# Altium PCB MB.PcbDoc (part 7 of 10)
Units mm, origin at the board's own origin, x right, y up, seen from the top; angles counter-clockwise.
Board outline 203 x 72 mm, 6 copper layers (Top Layer, Layer 3, Layer 1, Layer 2, Layer 4, Bottom Layer), stack 1.52 mm thick; 653 components, 568 nets, 2914 pads, 2399 vias.
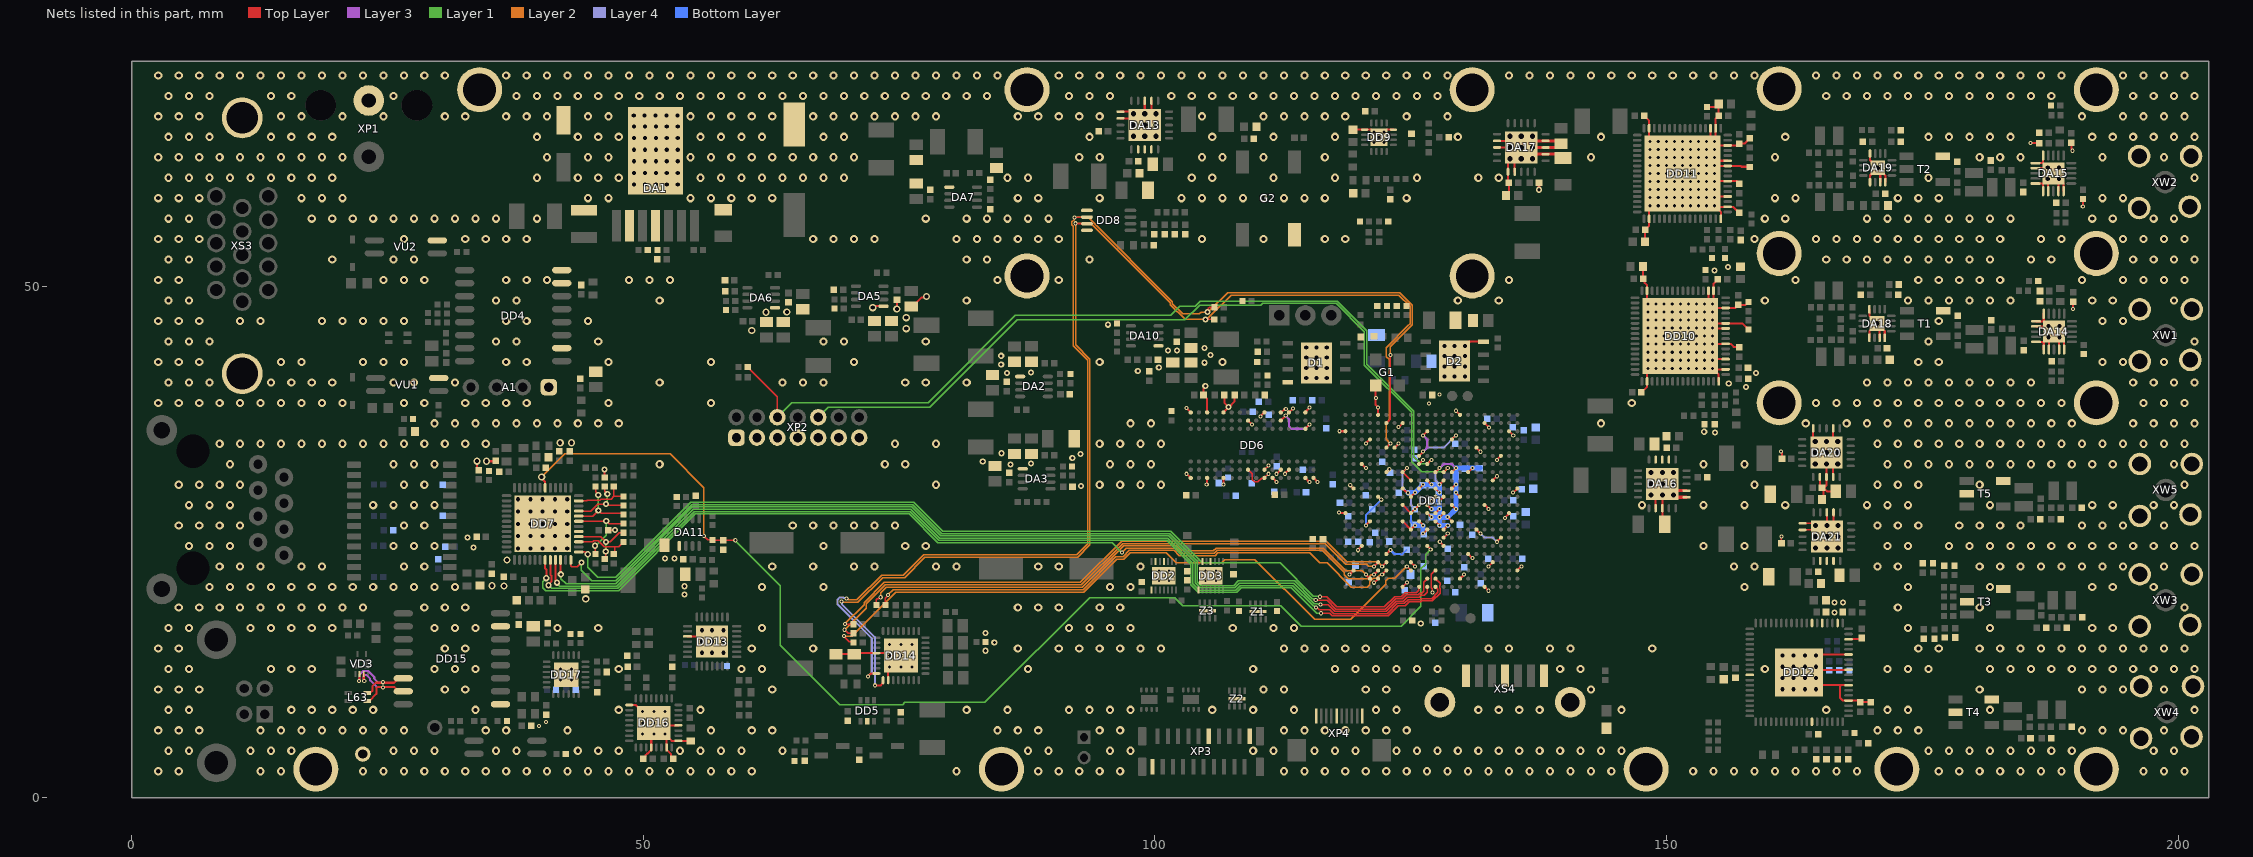
[diagram p10: the nets of this part, all layers, seen from the top]

## Via types
v1: diameter 0.8, hole 0.4, Top Layer to Bottom Layer, tented both sides, 1127 vias
v2: diameter 0.4, hole 0.2, Top Layer to Bottom Layer, tented both sides, 627 vias
v3: diameter 0.6, hole 0.3, Top Layer to Bottom Layer, tented both sides, 348 vias
v4: diameter 0.8, hole 0.4, Top Layer to Bottom Layer, 92 vias
v5: diameter 0.7, hole 0.4, Top Layer to Bottom Layer, tented both sides, 90 vias
v6: diameter 0.9, hole 0.5, Top Layer to Bottom Layer, 45 vias
v7: diameter 0.66, hole 0.4, Top Layer to Bottom Layer, 25 vias
v8: diameter 0.7, hole 0.3, Top Layer to Bottom Layer, 22 vias
v9: diameter 0.5, hole 0.2, Top Layer to Bottom Layer, 12 vias
v10: diameter 0.5, hole 0.3, Top Layer to Bottom Layer, 5 vias
v11: diameter 1, hole 0.5, Top Layer to Bottom Layer, 2 vias
v12: diameter 0.4, hole 0.2, Top Layer to Bottom Layer, 2 vias
v13: diameter 0.9, hole 0.4, Top Layer to Bottom Layer, tented both sides, 2 vias

## Nets (pads, with @x,y where several pads share a name; then routed paths per layer and width w, separated by ;. In a path a pad name is that pad's centre, name@x,y a point inside that pad or via, vN(x,y) a via of type N, cw(c..) or ccw(c..) an arc to the next point about the centre after c; other vN are vias at no path point) (continued)
ETH_RST: C155.2 DD1.U11 DD7.42 R70.1 | length 117.2
  Top Layer w0.125: v2(55.925,25.575) 56.285,25.215 R70.1@56.769,25.215 56.824,25.16 C155.2@57.825,25.16 58.973,25.16 v2(58.988,25.175)
  Top Layer w0.2: v5(40.069,31.369) 40.069,31.234 40.394,30.909 40.394,30.321 DD7.42@40.413,30.302 ; DD1.U11@126.612,24.625 126.612,24.619 126.95,24.281 v2(126.95,24.275)
  Layer 1 w0.125: v2(58.988,25.175) 58.988,25.137 63.375,20.75 63.375,14.925 69.195,9.105 75.337,9.105 75.557,9.325 83.389,9.325 93.639,19.575 101.925,19.575 102.725,18.775 112.315,18.775 114.313,16.777 124.077,16.777 126,18.7 126,22.379 126.449,22.828 126.449,23.774 v2(126.95,24.275)
  Layer 2 w0.125: v5(40.069,31.369) 42.312,33.613 52.637,33.613 55.925,30.325 v2(55.925,25.575)
ETH_RXC: DD7.35 R60.1 R75.1 | length 5.5
  Top Layer w0.125: DD7.35@43.688,29.027 44.467,29.027 44.502,29.063 45.754,29.063 45.881,29.19 46.843,29.19 47.117,29.464 ; R75.1@47.117,30.411 47.117,29.464 ; R60.1@48.064,29.464 47.117,29.464
ETH_RXCTL: DD7.33 R65.1 R76.1 | length 6.6
  Top Layer w0.125: DD7.33@43.688,28.027 44.864,28.027 45.539,28.702 46.484,28.702 46.611,28.575 R65.1@48.064,28.575 ; R76.1@46.228,30.411 46.228,29.97 46.482,29.716 v3(46.482,29.677)
  Layer 1 w0.125: v3(46.355,28.702) 46.355,28.831 46.482,28.958 v3(46.482,29.677)
ETH_RXD0: DD7.32 R66.2 R71.1 | length 7.2
  Top Layer w0.125: DD7.32@43.688,27.527 45.039,27.527 45.588,28.076 v3(45.602,28.076) ; R71.1@45.339,30.411 45.339,29.902 45.593,29.648 v3(45.593,29.591) ; v3@45.579,28.067 45.65,28.067 45.904,27.813 47.937,27.813 R66.2@48.064,27.686
  Layer 1 w0.125: v3(45.593,29.591) 45.597,29.587 45.597,28.08 v3(45.602,28.076)
ETH_RXD1: DD7.31 R67.2 R72.1 | length 8.2
  Top Layer w0.125: DD7.31@43.688,27.027 46.352,27.027 v3(46.375,27.05) 46.433,27.05 46.686,26.797 R67.2@48.064,26.797 ; v3(45.289,24.634) 45.289,23.868 R72.1@45.339,23.818
  Layer 1 w0.125: v3(45.289,24.634) 45.335,24.634 46.375,25.674 v3(46.375,27.05)
ETH_RXD2: DD7.28 R68.1 R73.1 | length 6.5
  Top Layer w0.125: DD7.28@43.688,25.527 45.856,25.527 v3(46.369,25.014) 46.389,25.034 46.784,25.034 47.65,25.9 48.056,25.9 R68.1@48.064,25.908 ; R73.1@46.228,23.564 46.304,23.564 46.328,23.587 v3(46.328,24.089)
  Layer 1 w0.125: v3(46.328,24.089) 46.348,24.11 46.348,24.993 v3(46.369,25.014)
ETH_RXD3: DD7.27 R69.1 R74.1 | length 5.6
  Top Layer w0.125: DD7.27@43.688,25.027 45.039,25.027 45.137,25.126 45.604,25.126 46.178,24.552 47.227,24.552 ; R74.1@47.117,23.818 47.227,23.928 47.227,24.552 ; R69.1@48.064,25.019 47.597,24.552 47.227,24.552
ETH_TXC: DD1.AA11 DD7.24 | length 96.2
  Top Layer w0.125: DD7.24@42.913,23.252 42.913,22.679 42.986,22.606 43.561,22.606 v3(43.942,22.987) ; v2(115.712,19.342) 115.765,19.289 116.829,19.289 117.668,18.45 122.51,18.45 123.51,19.45 124.186,19.45 124.561,19.825 125.714,19.825 125.901,20.012 126.062,20.012 126.249,20.199 126.249,21.062 DD1.AA11@126.612,21.425
  Layer 1 w0.125: v3(43.942,22.987) 43.942,22.258 44.975,21.225 47.284,21.225 54.709,28.65 76.343,28.65 79.168,25.825 101.443,25.825 104.15,23.118 104.15,21.125 104.525,20.75 107.7,20.75 108.15,21.2 113.66,21.2 115.38,19.479 115.5,19.479 115.638,19.342 v2(115.712,19.342)
ETH_TXCTL: DD1.AB10 DD7.25 | length 92.1
  Top Layer w0.125: DD7.25@43.688,24.027 44.279,24.027 44.503,23.804 v3(44.572,23.804) ; v2(116.135,19.652) 116.146,19.64 116.796,19.64 117.761,18.675 122.417,18.675 123.417,19.675 124.093,19.675 124.468,20.05 125.525,20.05 125.759,20.284 125.759,20.572 DD1.AB10@125.812,20.625
  Layer 1 w0.125: v3(44.572,23.804) 44.572,22.553 45.55,21.575 47.316,21.575 54.616,28.875 76.436,28.875 79.261,26.05 101.536,26.05 104.636,22.95 112.236,22.95 115.482,19.704 115.862,19.704 115.876,19.691 116.095,19.691 v2(116.135,19.652)
ETH_TXD0: DD1.Y5 DD7.19 | length 91.5
  Top Layer w0.2: DD7.19@40.413,23.252 40.413,22.432 40.53,22.315 40.53,21.48 v3(40.513,21.463) ; v2(121.411,21.824) DD1.Y5@121.812,22.225
  Layer 1 w0.125: v3(40.513,21.463) 40.15,21.1 40.15,20.55 40.45,20.25 47.582,20.25 55.082,27.75 75.97,27.75 78.795,24.925 95.812,24.925 v2(96.777,23.96)
  Layer 2 w0.125: v2(96.777,23.96) 97.217,24.4 101.981,24.4 102.481,23.9 105.793,23.9 106.068,24.175 116.363,24.175 118.5,22.038 118.5,21.821 118.896,21.425 120.802,21.425 121.157,21.779 121.366,21.779 v2(121.411,21.824)
ETH_TXD1: DD1.AA12 DD7.20 | length 101.3
  Top Layer w0.125: v2(116.223,18.04) 117.06,18.04 117.325,17.775 122.789,17.775 123.789,18.775 124.466,18.775 124.841,19.15 125.993,19.15 126.093,19.25 127.121,19.25 127.861,19.991 127.861,20.482 127.85,20.494 127.85,20.775 127.861,20.787 127.861,20.976 DD1.AA12@127.412,21.425
  Top Layer w0.2: v3(40.746,20.773) 40.746,20.881 41.038,21.173 41.038,21.68 40.913,21.805 DD7.20@40.913,23.252
  Layer 1 w0.125: v3(40.746,20.773) 41.044,20.475 47.489,20.475 54.989,27.975 76.063,27.975 78.888,25.15 101.163,25.15 103.475,22.838 103.475,20.845 104.245,20.075 107.98,20.075 108.43,20.525 113.329,20.525 115.814,18.04 v2(116.223,18.04)
ETH_TXD2: DD1.AB12 DD7.21 | length 98.9
  Top Layer w0.125: v2(115.75,18.617) 115.824,18.617 116.039,18.402 117.079,18.402 117.482,18 122.696,18 123.696,19 124.372,19 124.747,19.375 125.9,19.375 126,19.475 127.028,19.475 127.636,20.084 127.636,20.401 DD1.AB12@127.412,20.625
  Top Layer w0.2: DD7.21@41.413,23.252 41.413,21.243 41.552,21.103 v3(41.552,21.026)
  Layer 1 w0.125: v3(41.552,21.026) 41.552,20.995 41.847,20.7 47.396,20.7 54.896,28.2 76.157,28.2 78.982,25.375 101.257,25.375 103.7,22.932 103.7,20.939 104.339,20.3 107.886,20.3 108.336,20.75 113.473,20.75 115.469,18.754 115.539,18.754 115.677,18.617 v2(115.75,18.617)
ETH_TXD3: DD1.AB11 DD7.22 | length 96.9
  Top Layer w0.125: v2(116.183,18.875) 116.925,18.875 117.575,18.225 122.603,18.225 123.603,19.225 124.279,19.225 124.654,19.6 125.807,19.6 125.994,19.787 126.314,19.787 126.612,20.085 DD1.AB11@126.612,20.625
  Top Layer w0.2: DD7.22@41.913,23.252 41.913,21.869 v3(41.938,21.844)
  Layer 1 w0.125: v3(41.938,21.844) 41.945,21.837 41.945,21.43 42.45,20.925 47.302,20.925 54.802,28.425 76.25,28.425 79.075,25.6 101.35,25.6 103.925,23.025 103.925,21.032 104.432,20.525 107.793,20.525 108.243,20.975 113.567,20.975 115.562,18.979 115.908,18.979 115.96,18.928 116.13,18.928 v2(116.183,18.875)
GND: A1.1 C1.1 C2.1 C3.2 C4.1 C5.1 C6.1 C7.1 C8.1 C9.1 C10.1 C11.1 C12.1 C14.2 C15.1 C16.1 C17.1 C18.1 C19.1 C21.1 C22.1 C23.1 C26.2 C30.1 C31.1 C32.1 C33.1 C34.1 C35.1 C36.1 C37.1 C38.1 C39.1 C40.1 C41.1 C42.1 C43.1 C45.1 C46.1 C47.1 C48.1 C49.1 C50.1 C51.1 C53.1 C55.1 C56.1 C57.1 C59.1 C60.1 C61.1 C62.1 C63.1 C64.1 C65.1 C66.1 C67.1 C68.1 C69.1 C71.1 C75.1 C76.1 C77.1 C78.1 C79.1 C80.1 C81.1 C84.1 C85.1 C86.1 C87.1 C88.1 C89.1 C91.1 C92.1 C93.1 C94.1 C95.1 C96.1 C97.1 C98.1 C99.1 C100.1 C101.1 C102.1 C103.1 C104.1 C105.1 C106.1 C107.1 C108.1 C109.1 C110.1 C111.1 C112.1 C113.1 C114.1 C115.1 C116.1 C117.1 C118.1 C119.1 C120.1 C121.1 C122.2 C123.1 C124.1 C125.1 C126.1 C127.2 C128.1 C129.1 C131.1 C132.1 C133.1 C134.1 C135.1 C136.1 C138.1 C139.1 C140.1 C142.1 C143.1 C144.1 C145.1 C146.1 C147.1 C148.1 C149.1 C150.1 C151.1 C152.1 C153.1 C154.1 C155.1 C156.1 C157.1 C158.1 C159.1 C160.1 C161.1 C162.1 C163.1 C164.1 C165.1 C166.1 C167.1 C168.1 C169.1 C170.1 C171.1 C172.1 C173.2 C174.1 C175.1 C176.1 C177.1 C178.1 C179.1 C180.1 C181.2 C182.1 C183.2 C184.1 C185.1 C186.1 C187.1 C188.1 C189.1 C190.2 C191.1 C192.1 C193.2 C194.1 C195.2 C196.1 C197.1 C198.1 C199.1 C200.1 C202.1 C203.1 C204.1 C205.1 C208.1 C209.2 C210.1 C211.1 C212.1 C215.1 C216.1 C217.1 C218.1 C219.1 C220.1 C221.1 C222.1 C223.1 C224.1 C225.1 C226.1 C227.1 C228.1 C229.1 C230.1 C231.1 C232.1 C233.1 C234.1 C235.1 C236.1 C237.1 C242.1 C245.1 C247.1 C251.1 C252.1 C254.1 C255.1 C256.1 C257.1 C258.1 C259.1 C260.1 C261.1 C262.1 C263.1 C264.1 C265.1 C266.1 C267.1 C269.1 C270.1 C271.1 C272.1 C273.1 C274.1 C275.1 C276.1 C277.1 C278.1 C279.1 C280.1 C281.1 C282.1 C283.1 C284.1 C285.1 C286.1 C287.1 C288.1 C289.1 C290.1 C291.1 C292.1 C293.1 C294.1 C295.1 C296.1 C297.2 C298.1 C299.2 C301.1 C303.1 C306.1 C308.1 C309.1 C314.1 C316.1 C317.1 C320.1 C321.1 C322.1 C327.1 C346.1 C347.2 C348.2 C352.2 C359.1 D1.4 D1.9 D2.4 D2.9 DA1.2 DA1.4 DA1.8 DA2.1 DA3.1 DA5.1 DA6.1 DA7.1 DA10.1 DA11.1 DA13.7 DA13.8 DA13.11 DA13.12 DA13.17 DA13.18 DA13.19 DA13.21 DA14.10 DA14.11 DA14.12 DA14.15 DA14.16 DA14.17 DA14.19 DA14.20 DA14.21 DA15.10 DA15.11 DA15.12 DA15.15 DA15.16 DA15.17 DA15.19 DA15.20 DA15.21 DA16.7 DA16.8 DA16.11 DA16.12 DA16.17 DA16.18 DA16.19 DA16.21 DA17.7 DA17.8 DA17.11 DA17.12 DA17.17 DA17.18 DA17.19 DA17.21 DA18.4 DA18.9 DA18.11 DA18.12 DA18.17 DA19.4 DA19.9 DA19.11 DA19.12 DA19.17 DA20.7 DA20.10 DA20.17 DA20.18 DA20.19 DA20.21 DA21.7 DA21.8 DA21.11 DA21.12 DA21.17 DA21.18 DA21.19 DA21.21 DD1.A5 DD1.A15 DD1.AA5 DD1.AA15 DD1.AB8 DD1.AB18 DD1.B8 DD1.B18 DD1.C1 DD1.C11 DD1.C21 DD1.D4 DD1.D14 DD1.E7 DD1.E17 DD1.F10 DD1.F20 DD1.G3 DD1.G10 DD1.H6 DD1.H8 DD1.H12 DD1.H14 DD1.H16 DD1.J9 DD1.J11 DD1.J13 DD1.J19 DD1.K2 DD1.K8 DD1.K10 DD1.K12 DD1.K14 DD1.K22 DD1.L5 DD1.L9 DD1.L12 DD1.L13 DD1.L15 DD1.M8 DD1.M10 DD1.M11 DD1.M14 DD1.M18 DD1.N1 DD1.N9 DD1.N11 DD1.N12 DD1.N13 DD1.N21 DD1.P4 DD1.P8 DD1.P10 DD1.P12 DD1.P14 DD1.R9 DD1.R11 DD1.R13 DD1.R17 DD1.T13 DD1.T20 DD1.U3 DD1.U13 DD1.V6 DD1.V16 DD1.W9 DD1.W19 DD1.Y2 DD1.Y12 DD1.Y22 DD2.4 DD2.6 DD2.8 DD2.15 DD3.4 DD3.6 DD3.8 DD3.15 DD4.2 DD4.7 DD4.8 DD5.2 DD6.A9 DD6.B1 DD6.B3 DD6.B9 DD6.D1 DD6.D8 DD6.E1 DD6.E2 DD6.E8 DD6.F9 DD6.G1 DD6.G8 DD6.G9 DD6.J2 DD6.J8 DD6.M1 DD6.M9 DD6.P1 DD6.P9 DD6.T1 DD6.T9 DD7.29 DD7.49 DD8.5 DD8.8 DD9.5 DD9.16 DD9.17 DD10.2 DD10.4 DD10.7 DD10.10 DD10.11 DD10.14 DD10.18 DD10.19 DD10.31 DD10.50 DD10.64 DD10.65 DD11.2 DD11.4 DD11.7 DD11.10 DD11.11 DD11.14 DD11.18 DD11.19 DD11.31 DD11.50 DD11.64 DD11.65 DD12.2 DD12.5 DD12.7 DD12.28 DD12.48 DD12.58 DD12.61 DD12.64 DD12.67 DD12.70 DD12.73 DD13.3 DD13.29 DD14.12 DD14.18 DD14.33 DD15.9 DD15.15 DD16.4 DD16.7 DD16.9 DD16.12 DD16.25 DD16.33 DD17.25 G1.2 G2.2 HL1.2 L56.1 pad.1 R3.2 R5.2 R8.2 R10.2 R11.1 R14.2 R16.2 R18.2 R19.1 R29.1 R30.1 R34.1 R36.1 R45.2 R48.2 R51.2 R53.2 R55.2 R57.2 R58.2 R64.2 R76.2 R80.2 R87.2 R94.2 R95.2 R96.1 R97.1 R102.2 R104.2 R106.2 R108.2 R113.2 R114.2 R120.2 R122.2 R126.2 R128.2 R129.2 R130.2 R144.2 R146.2 R147.2 R148.2 R149.2 R150.2 R151.1 R155.1 R156.1 R158.1 R159.1 R161.1 R164.1 R166.1 R167.1 R168.1 R174.1 R177.1 T1.4 T2.4 T3.2 T3.4 T4.2 T4.4 T5.2 T5.4 VU1.2 VU2.2 XP1.2 XP2.1 XP2.3 XP2.5 XP2.7 XP2.9 XP2.11 XP2.13 XP3.1 XP3.12 XP3.20 XP4.1 XP4.5 XP4.10 XS3.16 XS4.1 XS4.4 XS4.7 XW1.2 XW2.2 XW3.2 XW4.2 XW5.2 Z1.9 Z2.9 Z3.9 | length 312.9
  Top Layer w0.125: C177.1@46.561,26.162 v3(47.244,26.162) ; DD6.J8@109.099,32.068 109.497,31.67 109.497,31.108 109.734,30.87 110.064,30.87 110.423,31.23 110.661,31.23 DD6.G9@110.699,31.268 ; v2(127.11,20.07) 127.087,20.093 127.087,20.458 127.024,20.52 127.024,21.837 DD1.Y12@127.412,22.225 ; C292.1@161.229,24.892 161.229,25.529 v2(161.25,25.55) ; DA21.12@163.289,26.177 165.014,26.177 v6(165.664,25.527) ; DA21.11@163.289,26.827 164.364,26.827 v6(164.564,26.627)
  Top Layer w0.2: v5(33.75,32.9) 33.759,32.891 33.759,32.185 C166.1@33.909,32.035 ; v5(34.671,32.893) 35.512,32.893 C176.1@35.56,32.941 ; v3(46.2,32.075) 46.2,31.339 R76.2@46.228,31.311 ; DD16.25@48.625,9.075 49.275,9.075 v8(49.925,8.425) ; C251.1@50.015,3.825 50.235,4.045 50.235,4.185 50.375,4.325 50.41,4.325 50.725,4.64 50.752,4.64 50.775,4.664 DD16.4@50.775,4.925 50.775,5.975 v8(51.025,6.225) ; v8(52.125,7.325) 52.375,7.075 DD16.12@53.425,7.075 ; C261.1@52.935,3.825 52.715,4.045 52.715,4.25 52.325,4.64 52.298,4.64 52.275,4.664 DD16.7@52.275,4.925 52.275,6.075 52.775,5.575 DD16.9@53.425,5.575 54.595,5.575 L56.1@54.625,5.545 ; DD13.3@54.325,15.775 55.15,15.775 ; C348.2@68.838,14.035 C347.2@70.616,14.035 70.731,14.15 DD14.12@72.775,14.15 73.825,14.15 v8(74.075,13.9) ; v5(72.425,47.9) 72.56,47.9 72.738,48.078 73.447,48.078 DA5.1@73.476,48.049 ; DD14.18@73.925,11.5 73.925,12.65 v8(74.075,12.8) ; v5(74.775,47.775) 74.775,48.673 C15.1@74.793,48.691 ; C8.1@76.19,48.02 76.34,48.02 77.224,48.904 77.579,48.904 v5(77.675,49) ; DA13.12@96.628,66.402 98.353,66.402 v6(99.003,65.752) ; DA13.11@96.628,67.052 97.703,67.052 v6(97.903,66.852) ; v6(99.003,66.852) DA13.8@99.003,68.127 ; DA13.7@99.653,68.127 99.653,67.227 100.028,66.852 v6(100.103,66.852) ; v2@103.082,38.09 DD6.T1@103.501,37.671 ; v2(103.098,31.669) DD6.T9@103.499,31.268 ; v3(104.92,40.259) 104.92,40.151 104.745,39.976 C124.1@104.745,39.37 105.099,39.016 DD6.P1@105.099,37.668 ; v2(105.059,30.607) 105.097,30.645 DD6.P9@105.097,31.27 ; v2(106.698,30.607) 106.698,31.263 DD6.M9@106.701,31.266 ; DD6.M1@106.699,37.668 107.177,38.146 v3(107.177,38.186) ; C125.1@106.777,39.37 106.777,38.591 107.177,38.191 v3(107.177,38.186) ; v3@107.164,38.186 v3(107.177,38.186) ; v3@107.2,38.15 107.793,38.743 C105.1@107.793,39.37 ; DD6.J2@109.099,36.868 v2(109.5,36.467) ; v2(110.298,37.267) DD6.G1@110.699,37.668 ; DD6.G9@110.701,31.266 v2(111.102,31.667) ; DD6.G8@110.701,32.066 v2(111.102,32.467) ; DD6.F9@111.497,31.266 v2(111.899,30.865) ; v2(111.896,31.669) DD6.E8@112.297,32.07 ; DD6.E2@112.301,36.866 112.301,36.874 112.785,37.357 v2(112.785,37.361) ; DD6.E1@112.301,37.666 112.357,37.666 112.617,37.926 112.729,37.926 v2(112.786,37.984) ; v2(112.696,31.669) DD6.D8@113.097,32.07 ; DD6.D1@113.101,37.666 v2(113.502,38.067) ; DD6.B9@114.697,31.266 v2(115.098,30.865) ; DD6.B3@114.701,36.066 v2(115.102,36.467) ; DD6.B1@114.701,37.666 114.701,37.709 115.102,38.11 v2(115.102,38.149) ; DD6.A9@115.497,31.266 v2(115.899,30.865) ; v2(118.001,27.883) 118.03,27.854 118.587,27.854 DD1.N1@118.614,27.827 ; v2(118.023,35.828) 118.025,35.827 DD1.C1@118.61,35.827 ; v2(119.011,21.824) DD1.Y2@119.412,22.225 ; v2(119.086,30.55) 119.408,30.229 DD1.K2@119.412,30.229 ; C200.1@119.359,65.297 119.37,65.308 DD9.5@120.496,65.308 121.146,65.308 v10(121.388,65.066) ; v2(119.835,24.199) 119.835,24.224 120.21,24.598 DD1.U3@120.21,24.627 ; DD1.G3@120.21,32.623 v2(120.611,32.222) ; v2(120.609,26.626) DD1.P4@121.01,27.027 ; v2(120.609,34.626) DD1.D4@121.01,35.027 ; v2(121.411,21.024) DD1.AA5@121.812,21.425 ; G1.2@121.575,40.305 121.575,38.4 121.799,38.176 v2(121.799,38.15) ; DD1.L5@121.81,29.423 121.821,29.423 122.108,29.136 v2(122.115,29.136) ; DD1.A5@121.812,37.425 v2@121.812,38.137 ; v10(122.404,65.066) 122.646,65.308 DD9.16@123.296,65.308 ; DD1.H6@122.612,31.825 v2(122.901,32.114) ; DD1.V6@122.614,23.823 v2(123.015,24.224) ; DD1.E7@123.412,34.225 v2(123.812,34.626) ; v2(123.811,36.224) DD1.B8@124.212,36.625 ; DD1.AB8@124.212,20.625 v2(124.613,21.026) ; DD1.P8@124.212,27.025 DD1.R9@125.012,26.225 v2(125.413,26.626) ; DD1.M8@124.212,28.625 DD1.N9@125.012,27.825 v2(125.413,28.226) DD1.M10@125.812,28.625 ; DD1.K8@124.212,30.225 124.583,29.854 124.687,29.854 v2(124.725,29.816) ; v2(124.613,32.226) DD1.H8@124.212,31.825 DD1.J9@125.012,31.025 ; DD1.W9@125.012,23.025 v2(125.413,22.624) ; DD1.L9@125.012,29.425 v2(125.413,29.826) ; DD1.P10@125.812,27.025 v2(126.213,26.624) ; DD1.K10@125.812,30.225 v2(126.213,30.626) ; DD1.G10@125.812,32.625 v2(126.213,33.026) ; DD1.F10@125.812,33.425 v2(126.213,33.826) ; v2(126.211,25.824) DD1.R11@126.612,26.225 ; v2(126.211,35.424) DD1.C11@126.612,35.825 ; DD1.N11@126.612,27.825 v2(127.013,27.424) ; DD1.M11@126.612,28.625 v2(127.013,28.224) ; DD1.J11@126.612,31.025 v2(127.013,30.624) ; v2(127.011,29.024) DD1.L12@127.412,29.425 ; DD1.P12@127.412,27.025 v2(127.813,26.624) ; DD1.N12@127.412,27.825 v2(127.813,28.226) ; DD1.K12@127.412,30.225 v2(127.813,29.824) ; DD1.H12@127.412,31.825 v2(127.813,32.226) ; v2(127.811,27.424) DD1.N13@128.212,27.825 ; v2(127.811,29.024) DD1.L13@128.212,29.425 ; v2(127.811,30.624) DD1.J13@128.212,31.025 ; v2(127.837,25.026) 127.837,25.013 128.212,24.638 DD1.U13@128.212,24.625 ; DD1.T13@128.212,25.425 v2(128.613,25.826) ; DD1.R13@128.212,26.225 v2(128.613,26.626) ; v2(128.611,27.426) DD1.P14@129.012,27.025 ; DD1.M14@129.012,28.625 v2(129.413,28.224) ; DD1.K14@129.012,30.225 v2(129.413,30.626) ; DD1.H14@129.012,31.825 v2(129.413,32.226) ; DD1.D14@129.012,35.025 v2(129.413,35.426) ; v2(129.411,29.826) DD1.L15@129.812,29.425 ; v2(129.411,37.826) DD1.A15@129.812,37.425 ; DD1.AA15@129.812,21.425 v2(130.213,21.826) ; v4(130.283,44.172) 130.683,44.572 130.795,44.572 130.8,44.577 D2.4@132.098,44.577 ; DD1.V16@130.612,23.825 v2(131.013,23.424) ; DD1.H16@130.612,31.825 v2(131.013,32.226) ; DD1.R17@131.412,26.225 v2(131.813,25.824) ; DD1.E17@131.412,34.225 v2(131.813,33.824) ; DD1.AB18@132.212,20.625 132.212,20.619 132.587,20.244 v2(132.587,20.238) ; DD1.M18@132.212,28.625 v2(132.613,28.224) ; DD1.B18@132.212,36.625 132.22,36.625 132.648,36.197 v2(132.655,36.197) ; v2(132.611,22.624) DD1.W19@133.012,23.025 ; DD1.J19@133.012,31.025 v2(133.413,31.426) ; v2(133.411,25.024) DD1.T20@133.812,25.425 ; v2(133.411,33.024) DD1.F20@133.812,33.425 ; DA17.8@133.426,63.556 v6(134.701,63.556) ; DA17.7@133.426,64.206 135.151,64.206 v6(135.801,63.556) ; v2(134.203,27.337) 134.203,27.376 134.612,27.786 DD1.N21@134.612,27.825 ; C221.1@134.312,58.857 134.579,59.124 C223.1@134.579,60.127 134.501,60.205 DA17.11@134.501,61.181 134.501,62.256 v6(134.701,62.456) ; DD1.C21@134.612,35.825 v2(135.013,35.424) ; DA17.21@134.776,62.456 135.151,62.081 DA17.12@135.151,61.181 ; v2(135.011,29.824) DD1.K22@135.412,30.225 ; DD1.Y22@135.412,22.225 v2(135.813,22.626) ; C267.1@147.544,39.624 148.092,40.172 DD10.50@148.092,40.698 148.092,41.792 148.192,41.892 DD10.65@148.192,41.974 ; C256.1@147.689,51.925 147.71,51.904 C262.1@147.71,50.75 147.85,50.61 147.85,50.325 148.092,50.083 DD10.31@148.092,49.548 148.092,48.454 148.192,48.354 DD10.65@148.192,48.273 ; C269.1@147.798,66.675 148.299,66.174 DD11.31@148.299,65.437 DD11.65@148.299,64.262 ; C259.1@147.9,54.35 C263.1@147.9,55.501 148.299,55.9 DD11.50@148.299,56.587 148.299,57.681 148.399,57.781 DD11.65@148.399,57.862 ; DA16.21@148.558,29.577 148.933,29.202 DA16.7@148.933,28.302 ; v6(149.583,29.577) DA16.8@149.583,28.302 149.583,26.967 C217.1@149.825,26.725 ; DD10.65@152.592,46.373 DD10.11@155.767,46.373 157.411,46.373 R102.2@158.006,45.778 ; DD11.65@152.799,62.262 DD11.11@155.974,62.262 ; DD10.65@153.704,47.485 154.092,47.873 DD10.14@155.767,47.873 156.682,47.873 C264.1@156.99,48.181 157.731,48.181 R104.2@158.006,48.456 ; DD10.65@153.704,48.273 154.092,48.66 DD10.19@154.092,49.548 ; R130.2@153.942,67.506 154.806,67.506 C245.1@155.1,67.8 155.087,67.787 C247.1@155.087,66.675 154.799,66.387 DD11.18@154.799,65.437 154.799,64.343 154.699,64.243 DD11.65@154.699,64.162 ; DD11.19@154.299,65.437 154.299,63.762 DD11.14@155.974,63.762 156.95,63.762 C252.1@157.117,63.929 157.133,63.945 157.62,63.945 R108.2@158.133,64.458 ; DD10.65@154.491,42.761 154.572,42.761 154.685,42.873 DD10.4@155.767,42.873 ; DD10.65@154.491,44.336 154.529,44.373 DD10.7@155.767,44.373 155.778,44.362 156.263,44.362 156.55,44.075 157.063,44.075 C266.1@157.117,44.021 ; DD10.65@154.491,45.91 154.529,45.873 DD10.10@155.767,45.873 ; DD10.65@154.491,48.273 154.491,48.354 154.592,48.454 DD10.18@154.592,49.548 154.592,50.259 C260.1@155.006,50.673 ; DD10.65@154.632,41.833 155.092,41.373 DD10.64@155.092,40.698 ; DD10.65@154.673,41.873 DD10.2@155.767,41.873 ; DD11.65@154.699,58.65 154.78,58.65 154.892,58.762 DD11.4@155.974,58.762 ; DD11.65@154.699,60.262 DD11.7@155.974,60.262 156.878,60.262 C265.1@157.117,60.023 ; DD11.65@154.699,61.762 DD11.10@155.974,61.762 157.238,61.762 157.325,61.675 158.111,61.675 R106.2@158.133,61.653 ; DD11.64@155.299,56.587 155.299,57.262 DD11.65@154.699,57.862 154.78,57.862 154.88,57.762 DD11.2@155.974,57.762 156.488,57.762 156.832,57.418 156.897,57.418 C257.1@157.117,57.198 ; v2(161.2,33.85) 161.2,33.796 161.259,33.737 161.259,33.165 C278.1@161.277,33.147 ; v4(163.51,11.709) 164.21,11.009 167.043,11.009 ; DA20.10@164.326,36.114 164.326,35.039 v6(164.526,34.839) ; DD12.73@164.61,12.509 DD12.64@167.785,12.509 ; v4(164.61,13.909) 164.71,14.009 DD12.67@167.785,14.009 ; DA20.17@164.976,31.364 164.976,30.65 C272.1@165.354,30.272 ; C271.1@165.367,29.129 165.354,29.142 C272.1@165.354,30.272 ; v6(165.626,32.639) DA20.18@165.626,31.364 165.626,30.544 C272.1@165.354,30.272 ; v6(165.626,33.739) 166.276,34.389 DA20.7@166.276,36.114 ; v6(165.664,25.527) 166.314,26.177 DA21.7@166.314,27.902 ; v6(165.664,26.627) DA21.8@165.664,27.902 ; DA20.19@166.276,31.364 166.276,32.264 166.651,32.639 v6(166.726,32.639) ; C280.1@166.625,29.95 165.676,29.95 C272.1@165.354,30.272 ; DD12.61@167.785,11.009 167.043,11.009 ; DD12.70@167.785,15.509 168.943,15.509 C294.1@169.055,15.621 ; DA18.9@169.821,44.955 169.821,45.605 v11(170.571,46.355) 169.821,47.105 DA18.4@169.821,47.755 ; DA19.9@169.881,60.168 169.881,60.818 v11(170.631,61.568) 169.881,62.318 DA19.4@169.881,62.968 ; C290.1@169.944,9.35 C295.1@168.928,9.35 168.769,9.509 DD12.58@167.785,9.509 167.216,9.509 166.95,9.775 166.95,10.916 167.043,11.009 ; DA18.11@170.821,44.955 170.821,46.105 171.321,45.605 DA18.12@171.321,44.955 ; DA19.11@170.881,60.168 170.881,61.318 171.381,60.818 DA19.12@171.381,60.168 ; v2(185.55,63.975) 186.429,63.975 C199.1@186.439,63.984 ; DA15.15@186.046,60.035 DA15.21@186.796,60.035 ; DA15.12@186.046,61.535 187.196,61.535 v4(187.246,61.585) ; DA15.11@186.046,62.035 186.796,62.035 DA15.10@186.796,62.785 ; DA14.15@186.109,44.565 DA14.21@186.859,44.565 ; DA14.12@186.109,46.065 187.259,46.065 v4(187.309,46.115) ; DA14.11@186.109,46.565 186.859,46.565 DA14.10@186.859,47.315 ; DA15.16@186.796,59.285 DA15.21@186.796,60.035 ; DA14.16@186.859,43.815 DA14.21@186.859,44.565 ; DA15.17@187.296,59.285 187.296,60.435 v4(187.246,60.485) ; DA14.17@187.359,43.815 187.359,44.965 v4(187.309,45.015) ; DA15.19@188.296,59.285 188.296,60.435 v4(188.346,60.485) 188.796,60.035 DA15.20@188.796,59.285 ; DA14.19@188.359,43.815 188.359,44.965 v4(188.409,45.015) 188.859,44.565 DA14.20@188.859,43.815 ; C189.1@189.566,64.032 189.55,64.017 189.55,63.397 189.658,63.289 v2(189.658,63.235) ; v2(189.722,47.765) 189.722,48.456 C188.1@189.748,48.483 ; v2(190.675,57.8) 190.675,58.49 R97.1@190.709,58.523 ; DA15.21@186.796,60.035 186.821,60.06 v4(187.246,60.485) ; DA15.21@186.796,60.035 v4(187.246,60.485) ; DA14.21@186.859,44.565 v4(187.309,45.015) ; DA14.21@186.859,44.565 186.884,44.59 v4(187.309,45.015)
  Top Layer w0.3: v6(135.801,63.556) 136.451,64.206 DA17.19@138.176,64.206 139.394,64.206 C235.1@139.675,63.925 139.525,63.925 139.156,63.556 DA17.18@138.176,63.556 v6(136.901,63.556) ; v6(136.901,62.456) 136.901,62.495 137.312,62.906 DA17.17@138.176,62.906 139.494,62.906 C219.1@139.875,62.525 ; v3(137.525,59.425) 137.528,59.428 137.528,60.124 C231.1@137.531,60.127 ; v6(149.583,30.677) 150.233,30.027 DA16.12@151.958,30.027 ; v6(150.683,29.577) 150.883,29.377 DA16.11@151.958,29.377
  Layer 3 w0.2: v2(112.785,37.361) 112.785,37.307 113.102,36.989 113.102,36.302 113.337,36.067 114.702,36.067 v2(115.102,36.467) ; v2(126.211,35.424) 126.611,35.024 126.611,34.224 v2(126.213,33.826) ; v2(127.813,32.226) 128.213,32.626 129.013,32.626 v2(129.413,32.226)
  Layer 4 w0.2: v2(124.613,32.226) 124.213,31.826 124.213,30.327 v2(124.725,29.816) 124.725,29.761 125.013,29.473 125.013,28.626 v2(125.413,28.226) ; v2(126.213,33.826) 126.613,34.226 128.213,34.226 v2(129.413,35.426) ; v2(127.811,30.624) 127.413,31.021 127.413,31.826 v2(127.813,32.226) 128.213,32.626 129.013,32.626 v2(129.413,32.226) ; v2(131.813,25.824) 132.213,25.424 133.011,25.424 v2(133.411,25.024)
  Bottom Layer w0.2: v2(120.609,26.626) 120.609,27.629 v2(122.115,29.136) ; v2(123.015,24.224) 123.413,23.826 123.976,23.826 124.001,23.802 124.167,23.802 C62.1@124.59,24.225 ; v2(125.413,26.626) 125.358,26.626 125.013,26.971 125.013,27.819 C60.1@125.413,28.219
  Bottom Layer w0.5: v2(124.725,29.816) 124.736,29.826 v2(125.413,29.826) v2(126.213,30.626) 126.216,30.624 v2(127.013,30.624) v2(127.811,30.624) 127.813,30.621 v2(127.813,29.824) v2(127.813,28.226) ; v2(125.413,26.626) 125.416,26.624 v2(126.213,26.624) 126.213,25.826 v2(126.211,25.824) ; v2(127.011,29.024) v2(127.811,29.024) ; v2(127.013,27.424) v2(127.811,27.424) ; v2(127.013,28.224) 127.016,28.226 v2(127.813,28.226) ; v2(128.613,26.626) 128.611,26.624 v2(127.813,26.624) 127.813,27.421 v2(127.811,27.424) ; C151.1@131.754,32.223 131.75,32.226 v2(131.013,32.226) v2(129.413,32.226) v2(129.413,30.626) v2(129.413,28.224) 128.616,27.426 v2(128.611,27.426) 128.608,27.424 v2(127.811,27.424) ; v2(127.811,27.424) 127.811,28.224 v2(127.813,28.226)
  other v1: 2.6,2.6 4.6,2.6 12.6,2.6 14.6,2.6 22.6,2.6 24.6,2.6 26.6,2.6 28.6,2.6 30.6,2.6 32.6,2.6 34.6,2.6 36.6,2.6 38.6,2.6 40.6,2.6 42.6,2.6 44.6,2.6 46.6,2.6 48.6,2.6 50.6,2.6 52.6,2.6 54.6,2.6 56.6,2.6 58.6,2.6 60.6,2.6 80.6,2.6 88.6,2.6 90.6,2.6 92.6,2.6 94.6,2.6 96.6,2.6 112.6,2.6 114.6,2.6 116.6,2.6 118.6,2.6 120.6,2.6 122.6,2.6 124.6,2.6 126.6,2.6 128.6,2.6 130.6,2.6 132.6,2.6 134.6,2.6 136.6,2.6 138.6,2.6 140.6,2.6 142.6,2.6 144.6,2.6 152.6,2.6 154.6,2.6 156.6,2.6 158.6,2.6 160.6,2.6 162.6,2.6 164.6,2.6 166.6,2.6 168.6,2.6 176.6,2.6 178.6,2.6 180.6,2.6 182.6,2.6 184.6,2.6 186.6,2.6 188.6,2.6 196.6,2.6 198.6,2.6 200.6,2.6 3.6,4.6 5.6,4.6 11.6,4.6 13.6,4.6 15.6,4.6 25.6,4.6 27.6,4.6 29.6,4.6 35.6,4.6 37.6,4.6 43.6,4.6 45.6,4.6 47.6,4.6 53.6,4.6 55.6,4.6 57.6,4.6 59.6,4.6 63.6,4.6 87.6,4.6 89.6,4.6 95.6,4.6 97.6,4.6 109.6,4.6 111.6,4.6 115.6,4.6 117.6,4.6 119.6,4.6 123.6,4.6 125.6,4.6 127.6,4.6 129.6,4.6 131.6,4.6 133.6,4.6 135.6,4.6 137.6,4.6 139.6,4.6 141.6,4.6 143.6,4.6 145.6,4.6 175.6,4.6 177.6,4.6 179.6,4.6 181.6,4.6 183.6,4.6 185.6,4.6 187.6,4.6 189.6,4.6 197.6,4.6 199.6,4.6 2.6,6.6 4.6,6.6 6.6,6.6 12.6,6.6 14.6,6.6 16.6,6.6 18.6,6.6 20.6,6.6 22.6,6.6 24.6,6.6 26.6,6.6 34.6,6.6 36.6,6.6 42.6,6.6 56.6,6.6 60.6,6.6 62.6,6.6 84.6,6.6 86.6,6.6 88.6,6.6 94.6,6.6 96.6,6.6 112.6,6.6 114.6,6.6 116.6,6.6 118.6,6.6 120.6,6.6 122.6,6.6 124.6,6.6 170.6,6.6 172.6,6.6 174.6,6.6 190.6,6.6 192.6,6.6 194.6,6.6 198.6,6.6 3.6,8.6 5.6,8.6 15.6,8.6 17.6,8.6 19.6,8.6 21.6,8.6 23.6,8.6 33.6,8.6 47.6,8.6 55.6,8.6 81.6,8.6 85.6,8.6 91.6,8.6 93.6,8.6 95.6,8.6 97.6,8.6 105.6,8.6 109.6,8.6 113.6,8.6 121.6,8.6 123.6,8.6 131.6,8.6 133.6,8.6 135.6,8.6 137.6,8.6 145.6,8.6 165.6,8.6 171.6,8.6 173.6,8.6 181.6,8.6 201.6,8.6 2.6,10.6 4.6,10.6 6.6,10.6 30.6,10.6 32.6,10.6 62.6,10.6 110.6,10.6 112.6,10.6 120.6,10.6 122.6,10.6 142.6,10.6 180.6,10.6 190.6,10.6 192.6,10.6 194.6,10.6 198.6,10.6 3.6,12.6 5.6,12.6 13.6,12.6 15.6,12.6 17.6,12.6 29.6,12.6 31.6,12.6 33.6,12.6 47.6,12.6 59.6,12.6 61.6,12.6 87.6,12.6 109.6,12.6 117.6,12.6 119.6,12.6 121.6,12.6 123.6,12.6 125.6,12.6 127.6,12.6 139.6,12.6 141.6,12.6 159.6,12.6 171.6,12.6 173.6,12.6 175.6,12.6 181.6,12.6 183.6,12.6 185.6,12.6 187.6,12.6 189.6,12.6 191.6,12.6 193.6,12.6 195.6,12.6 197.6,12.6 199.6,12.6 201.6,12.6 2.6,14.6 4.6,14.6 30.6,14.6 32.6,14.6 60.6,14.6 66.6,14.6 86.6,14.6 90.6,14.6 92.6,14.6 94.6,14.6 96.6,14.6 98.6,14.6 100.6,14.6 112.6,14.6 114.6,14.6 116.6,14.6 118.6,14.6 120.6,14.6 122.6,14.6 126.6,14.6 128.6,14.6 132.6,14.6 134.6,14.6 138.6,14.6 140.6,14.6 148.6,14.6 174.6,14.6 176.6,14.6 180.6,14.6 182.6,14.6 184.6,14.6 186.6,14.6 188.6,14.6 190.6,14.6 192.6,14.6 194.6,14.6 196.6,14.6 198.6,14.6 200.6,14.6 3.6,16.6 5.6,16.6 11.6,16.6 13.6,16.6 15.6,16.6 17.6,16.6 19.6,16.6 29.6,16.6 31.6,16.6 33.6,16.6 41.6,16.6 45.6,16.6 61.6,16.6 91.6,16.6 93.6,16.6 95.6,16.6 97.6,16.6 107.6,16.6 111.6,16.6 113.6,16.6 173.6,16.6 181.6,16.6 191.6,16.6 193.6,16.6 4.6,18.6 6.6,18.6 8.6,18.6 10.6,18.6 12.6,18.6 14.6,18.6 16.6,18.6 18.6,18.6 20.6,18.6 22.6,18.6 28.6,18.6 30.6,18.6 32.6,18.6 86.6,18.6 88.6,18.6 90.6,18.6 94.6,18.6 96.6,18.6 172.6,18.6 180.6,18.6 200.6,18.6 7.6,20.6 9.6,20.6 11.6,20.6 13.6,20.6 15.6,20.6 17.6,20.6 19.6,20.6 21.6,20.6 23.6,20.6 25.6,20.6 27.6,20.6 29.6,20.6 31.6,20.6 61.6,20.6 67.6,20.6 95.6,20.6 97.6,20.6 157.6,20.6 173.6,20.6 181.6,20.6 191.6,20.6 193.6,20.6 197.6,20.6 8.6,22.6 10.6,22.6 12.6,22.6 16.6,22.6 18.6,22.6 26.6,22.6 28.6,22.6 62.6,22.6 66.6,22.6 70.6,22.6 72.6,22.6 78.6,22.6 80.6,22.6 88.6,22.6 90.6,22.6 98.6,22.6 156.6,22.6 158.6,22.6 170.6,22.6 172.6,22.6 180.6,22.6 182.6,22.6 184.6,22.6 186.6,22.6 188.6,22.6 190.6,22.6 192.6,22.6 194.6,22.6 198.6,22.6 5.6,24.6 7.6,24.6 9.6,24.6 25.6,24.6 27.6,24.6 29.6,24.6 67.6,24.6 75.6,24.6 77.6,24.6 153.6,24.6 157.6,24.6 171.6,24.6 173.6,24.6 177.6,24.6 179.6,24.6 181.6,24.6 183.6,24.6 185.6,24.6 187.6,24.6 189.6,24.6 191.6,24.6 193.6,24.6 195.6,24.6 197.6,24.6 199.6,24.6 201.6,24.6 4.6,26.6 6.6,26.6 8.6,26.6 10.6,26.6 26.6,26.6 28.6,26.6 64.6,26.6 66.6,26.6 68.6,26.6 70.6,26.6 72.6,26.6 74.6,26.6 170.6,26.6 172.6,26.6 174.6,26.6 178.6,26.6 180.6,26.6 182.6,26.6 184.6,26.6 190.6,26.6 192.6,26.6 194.6,26.6 198.6,26.6 5.6,28.6 7.6,28.6 9.6,28.6 23.6,28.6 25.6,28.6 27.6,28.6 29.6,28.6 147.6,28.6 153.6,28.6 157.6,28.6 161.6,28.6 169.6,28.6 171.6,28.6 173.6,28.6 181.6,28.6 191.6,28.6 193.6,28.6 197.6,28.6 199.6,28.6 4.6,30.6 6.6,30.6 8.6,30.6 10.6,30.6 26.6,30.6 28.6,30.6 78.6,30.6 94.6,30.6 96.6,30.6 98.6,30.6 100.6,30.6 158.6,30.6 170.6,30.6 172.6,30.6 174.6,30.6 180.6,30.6 200.6,30.6 9.6,32.6 25.6,32.6 27.6,32.6 29.6,32.6 51.6,32.6 73.6,32.6 75.6,32.6 95.6,32.6 97.6,32.6 99.6,32.6 153.6,32.6 157.6,32.6 171.6,32.6 173.6,32.6 175.6,32.6 177.6,32.6 179.6,32.6 181.6,32.6 183.6,32.6 185.6,32.6 187.6,32.6 189.6,32.6 191.6,32.6 193.6,32.6 199.6,32.6 8.6,34.6 10.6,34.6 12.6,34.6 14.6,34.6 16.6,34.6 18.6,34.6 20.6,34.6 22.6,34.6 24.6,34.6 26.6,34.6 28.6,34.6 30.6,34.6 32.6,34.6 34.6,34.6 74.6,34.6 78.6,34.6 94.6,34.6 96.6,34.6 98.6,34.6 100.6,34.6 170.6,34.6 172.6,34.6 174.6,34.6 176.6,34.6 178.6,34.6 180.6,34.6 182.6,34.6 184.6,34.6 186.6,34.6 188.6,34.6 190.6,34.6 192.6,34.6 194.6,34.6 196.6,34.6 198.6,34.6 200.6,34.6 29.6,36.6 31.6,36.6 33.6,36.6 35.6,36.6 37.6,36.6 39.6,36.6 41.6,36.6 43.6,36.6 45.6,36.6 47.6,36.6 97.6,36.6 99.6,36.6 143.6,36.6 163.6,36.6 167.6,36.6 169.6,36.6 171.6,36.6 173.6,36.6 175.6,36.6 177.6,36.6 179.6,36.6 181.6,36.6 183.6,36.6 185.6,36.6 187.6,36.6 189.6,36.6 195.6,36.6 197.6,36.6 199.6,36.6 201.6,36.6 2.6,38.6 4.6,38.6 6.6,38.6 8.6,38.6 10.6,38.6 12.6,38.6 14.6,38.6 16.6,38.6 18.6,38.6 20.6,38.6 26.6,38.6 28.6,38.6 32.6,38.6 34.6,38.6 36.6,38.6 38.6,38.6 46.6,38.6 56.6,38.6 146.6,38.6 164.6,38.6 166.6,38.6 168.6,38.6 170.6,38.6 172.6,38.6 174.6,38.6 176.6,38.6 178.6,38.6 180.6,38.6 182.6,38.6 184.6,38.6 186.6,38.6 188.6,38.6 196.6,38.6 198.6,38.6 200.6,38.6 3.6,40.6 5.6,40.6 7.6,40.6 13.6,40.6 15.6,40.6 17.6,40.6 19.6,40.6 25.6,40.6 27.6,40.6 31.6,40.6 51.6,40.6 63.6,40.6 65.6,40.6 67.6,40.6 75.6,40.6 77.6,40.6 81.6,40.6 169.6,40.6 171.6,40.6 173.6,40.6 175.6,40.6 177.6,40.6 179.6,40.6 181.6,40.6 183.6,40.6 185.6,40.6 195.6,40.6 197.6,40.6 199.6,40.6 201.6,40.6 2.6,42.6 4.6,42.6 6.6,42.6 14.6,42.6 16.6,42.6 22.6,42.6 24.6,42.6 26.6,42.6 36.6,42.6 38.6,42.6 46.6,42.6 56.6,42.6 70.6,42.6 94.6,42.6 106.6,42.6 174.6,42.6 176.6,42.6 192.6,42.6 194.6,42.6 198.6,42.6 3.6,44.6 5.6,44.6 7.6,44.6 35.6,44.6 37.6,44.6 45.6,44.6 67.6,44.6 69.6,44.6 77.6,44.6 175.6,44.6 201.6,44.6 2.6,46.6 4.6,46.6 6.6,46.6 10.6,46.6 12.6,46.6 18.6,46.6 20.6,46.6 22.6,46.6 24.6,46.6 26.6,46.6 36.6,46.6 38.6,46.6 44.6,46.6 176.6,46.6 192.6,46.6 194.6,46.6 3.6,48.6 5.6,48.6 35.6,48.6 37.6,48.6 51.6,48.6 81.6,48.6 129.6,48.6 133.6,48.6 159.6,48.6 173.6,48.6 175.6,48.6 177.6,48.6 179.6,48.6 181.6,48.6 183.6,48.6 191.6,48.6 193.6,48.6 199.6,48.6 2.6,50.6 4.6,50.6 24.6,50.6 26.6,50.6 28.6,50.6 36.6,50.6 38.6,50.6 40.6,50.6 48.6,50.6 50.6,50.6 52.6,50.6 84.6,50.6 90.6,50.6 134.6,50.6 162.6,50.6 174.6,50.6 176.6,50.6 178.6,50.6 180.6,50.6 182.6,50.6 190.6,50.6 194.6,50.6 196.6,50.6 198.6,50.6 200.6,50.6 3.6,52.6 5.6,52.6 19.6,52.6 25.6,52.6 27.6,52.6 81.6,52.6 83.6,52.6 93.6,52.6 165.6,52.6 167.6,52.6 169.6,52.6 171.6,52.6 173.6,52.6 175.6,52.6 177.6,52.6 179.6,52.6 181.6,52.6 185.6,52.6 187.6,52.6 195.6,52.6 197.6,52.6 199.6,52.6 201.6,52.6 2.6,54.6 4.6,54.6 6.6,54.6 26.6,54.6 32.6,54.6 34.6,54.6 36.6,54.6 38.6,54.6 66.6,54.6 68.6,54.6 70.6,54.6 72.6,54.6 80.6,54.6 82.6,54.6 84.6,54.6 86.6,54.6 88.6,54.6 90.6,54.6 104.6,54.6 110.6,54.6 116.6,54.6 118.6,54.6 158.6,54.6 164.6,54.6 166.6,54.6 168.6,54.6 170.6,54.6 172.6,54.6 174.6,54.6 176.6,54.6 178.6,54.6 180.6,54.6 182.6,54.6 186.6,54.6 188.6,54.6 194.6,54.6 196.6,54.6 198.6,54.6 200.6,54.6 3.6,56.6 5.6,56.6 17.6,56.6 19.6,56.6 21.6,56.6 23.6,56.6 25.6,56.6 27.6,56.6 29.6,56.6 31.6,56.6 33.6,56.6 35.6,56.6 39.6,56.6 77.6,56.6 81.6,56.6 83.6,56.6 85.6,56.6 87.6,56.6 89.6,56.6 159.6,56.6 161.6,56.6 169.6,56.6 171.6,56.6 173.6,56.6 175.6,56.6 177.6,56.6 179.6,56.6 181.6,56.6 183.6,56.6 191.6,56.6 193.6,56.6 197.6,56.6 199.6,56.6 2.6,58.6 4.6,58.6 6.6,58.6 16.6,58.6 18.6,58.6 20.6,58.6 44.6,58.6 46.6,58.6 54.6,58.6 56.6,58.6 58.6,58.6 60.6,58.6 62.6,58.6 86.6,58.6 88.6,58.6 94.6,58.6 102.6,58.6 104.6,58.6 106.6,58.6 108.6,58.6 110.6,58.6 112.6,58.6 114.6,58.6 116.6,58.6 124.6,58.6 160.6,58.6 162.6,58.6 172.6,58.6 174.6,58.6 176.6,58.6 192.6,58.6 194.6,58.6 3.6,60.6 5.6,60.6 7.6,60.6 9.6,60.6 11.6,60.6 13.6,60.6 15.6,60.6 17.6,60.6 19.6,60.6 39.6,60.6 43.6,60.6 45.6,60.6 47.6,60.6 55.6,60.6 57.6,60.6 59.6,60.6 61.6,60.6 63.6,60.6 65.6,60.6 67.6,60.6 69.6,60.6 85.6,60.6 87.6,60.6 103.6,60.6 105.6,60.6 111.6,60.6 117.6,60.6 125.6,60.6 131.6,60.6 133.6,60.6 175.6,60.6 201.6,60.6 2.6,62.6 4.6,62.6 6.6,62.6 8.6,62.6 10.6,62.6 12.6,62.6 14.6,62.6 16.6,62.6 18.6,62.6 20.6,62.6 40.6,62.6 44.6,62.6 46.6,62.6 54.6,62.6 56.6,62.6 58.6,62.6 60.6,62.6 62.6,62.6 64.6,62.6 66.6,62.6 68.6,62.6 70.6,62.6 92.6,62.6 94.6,62.6 104.6,62.6 106.6,62.6 110.6,62.6 116.6,62.6 142.6,62.6 160.6,62.6 180.6,62.6 182.6,62.6 184.6,62.6 192.6,62.6 198.6,62.6 3.6,64.6 5.6,64.6 7.6,64.6 13.6,64.6 15.6,64.6 17.6,64.6 19.6,64.6 39.6,64.6 43.6,64.6 45.6,64.6 47.6,64.6 55.6,64.6 57.6,64.6 59.6,64.6 61.6,64.6 67.6,64.6 69.6,64.6 93.6,64.6 105.6,64.6 111.6,64.6 117.6,64.6 129.6,64.6 143.6,64.6 161.6,64.6 175.6,64.6 177.6,64.6 179.6,64.6 181.6,64.6 183.6,64.6 191.6,64.6 193.6,64.6 195.6,64.6 197.6,64.6 199.6,64.6 201.6,64.6 2.6,66.6 4.6,66.6 6.6,66.6 14.6,66.6 16.6,66.6 20.6,66.6 24.6,66.6 30.6,66.6 32.6,66.6 36.6,66.6 38.6,66.6 40.6,66.6 44.6,66.6 46.6,66.6 54.6,66.6 56.6,66.6 58.6,66.6 60.6,66.6 62.6,66.6 66.6,66.6 68.6,66.6 70.6,66.6 72.6,66.6 74.6,66.6 76.6,66.6 78.6,66.6 86.6,66.6 88.6,66.6 90.6,66.6 92.6,66.6 94.6,66.6 104.6,66.6 110.6,66.6 112.6,66.6 114.6,66.6 116.6,66.6 118.6,66.6 124.6,66.6 128.6,66.6 190.6,66.6 194.6,66.6 196.6,66.6 198.6,66.6 200.6,66.6 3.6,68.6 5.6,68.6 7.6,68.6 13.6,68.6 15.6,68.6 25.6,68.6 37.6,68.6 39.6,68.6 41.6,68.6 43.6,68.6 45.6,68.6 47.6,68.6 49.6,68.6 51.6,68.6 53.6,68.6 55.6,68.6 57.6,68.6 59.6,68.6 61.6,68.6 63.6,68.6 65.6,68.6 67.6,68.6 69.6,68.6 71.6,68.6 73.6,68.6 75.6,68.6 77.6,68.6 79.6,68.6 81.6,68.6 83.6,68.6 91.6,68.6 93.6,68.6 95.6,68.6 101.6,68.6 103.6,68.6 105.6,68.6 107.6,68.6 109.6,68.6 111.6,68.6 113.6,68.6 115.6,68.6 117.6,68.6 119.6,68.6 121.6,68.6 123.6,68.6 125.6,68.6 127.6,68.6 165.6,68.6 167.6,68.6 169.6,68.6 171.6,68.6 173.6,68.6 175.6,68.6 177.6,68.6 179.6,68.6 181.6,68.6 183.6,68.6 185.6,68.6 187.6,68.6 195.6,68.6 197.6,68.6 199.6,68.6 201.6,68.6 2.6,70.6 4.6,70.6 6.6,70.6 8.6,70.6 10.6,70.6 12.6,70.6 14.6,70.6 16.6,70.6 18.6,70.6 20.6,70.6 22.6,70.6 24.6,70.6 26.6,70.6 28.6,70.6 30.6,70.6 36.6,70.6 38.6,70.6 40.6,70.6 42.6,70.6 44.6,70.6 46.6,70.6 48.6,70.6 50.6,70.6 52.6,70.6 54.6,70.6 56.6,70.6 58.6,70.6 60.6,70.6 62.6,70.6 64.6,70.6 66.6,70.6 68.6,70.6 70.6,70.6 72.6,70.6 74.6,70.6 76.6,70.6 78.6,70.6 80.6,70.6 82.6,70.6 84.6,70.6 90.6,70.6 92.6,70.6 94.6,70.6 96.6,70.6 98.6,70.6 100.6,70.6 102.6,70.6 104.6,70.6 106.6,70.6 108.6,70.6 110.6,70.6 112.6,70.6 114.6,70.6 116.6,70.6 118.6,70.6 120.6,70.6 122.6,70.6 124.6,70.6 126.6,70.6 128.6,70.6 134.6,70.6 136.6,70.6 138.6,70.6 140.6,70.6 142.6,70.6 144.6,70.6 146.6,70.6 148.6,70.6 150.6,70.6 152.6,70.6 154.6,70.6 156.6,70.6 158.6,70.6 164.6,70.6 166.6,70.6 168.6,70.6 170.6,70.6 172.6,70.6 174.6,70.6 176.6,70.6 178.6,70.6 180.6,70.6 182.6,70.6 184.6,70.6 186.6,70.6 188.6,70.6 194.6,70.6 196.6,70.6 198.6,70.6 200.6,70.6
  other v2: 39.825,7.025 40.5,7.4 103.082,38.094 126.8,38.55 121.588,39.088 127.813,39.423
  other v3: 83.425,14.375 84.3,15.175 83.425,16.125 125.975,17.025 166.4,18.1 166.425,19.1 167.25,19.1 54.028,19.876 54.028,20.676 52.125,23.375 53.05,23.375 33.4,24.475 32.825,25.45 92.775,30.475 85.9,32.575 87.875,32.675 83.175,32.875 91.925,33.2 92.725,33.6 85,33.675 154.725,35.7 153.675,35.775 157.775,40.15 156.075,40.475 158.725,41.512 85.525,41.525 87.875,41.575 98.325,41.7 100.375,42.05 84.975,42.35 104.825,42.525 84.975,43.2 105.425,43.275 101.275,43.7 102.15,43.7 104.825,43.975 95.4,46.237 154.7,51.55 156,51.875
  other v4: 161.31,10.609 162.41,10.609 163.51,10.609 164.61,10.609 161.31,11.709 162.41,11.709 164.61,11.709 161.31,12.809 162.41,12.809 163.51,12.809 164.61,12.809 161.31,13.909 162.41,13.909 163.51,13.909 55.75,14.175 56.725,14.175 57.825,14.175 55.75,15.275 56.725,15.275 57.825,15.275 55.75,16.375 56.725,16.375 57.825,16.375 114.785,41.015 115.785,41.015 116.785,41.015 128.283,41.172 129.283,41.172 130.283,41.172 114.785,42.015 115.785,42.015 116.785,42.015 128.283,42.172 129.283,42.172 130.283,42.172 114.785,43.015 115.785,43.015 116.785,43.015 128.283,43.172 129.283,43.172 130.283,43.172 114.785,44.015 115.785,44.015 116.785,44.015 128.283,44.172 129.283,44.172 188.409,46.115 49.088,59.95 50.156,59.95 51.225,59.95 52.294,59.95 53.362,59.95 49.088,61.079 50.156,61.079 51.225,61.079 52.294,61.079 53.362,61.079 188.346,61.585 49.088,62.208 50.156,62.208 51.225,62.208 52.294,62.208 53.362,62.208 49.088,63.338 50.156,63.338 51.225,63.338 52.294,63.338 53.362,63.338 49.088,64.467 50.156,64.467 51.225,64.467 52.294,64.467 53.362,64.467 49.088,65.596 50.156,65.596 51.225,65.596 52.294,65.596 53.362,65.596 49.063,66.675 50.131,66.675 51.2,66.675 52.269,66.675 53.337,66.675
  other v5: 44.375,19.45 36.4,20.7 35.225,20.725 36.689,23.239 41.875,34.7 42.975,34.7 60.6,45.675 75.7,45.85 75.7,46.925 62.003,47.45 64.025,47.475
  other v6: 164.564,24.427 165.664,24.427 166.764,24.427 164.564,25.527 166.764,25.527 166.764,26.627 148.483,29.577 148.483,30.677 150.683,30.677 148.483,31.777 149.583,31.777 150.683,31.777 164.526,32.639 164.526,33.739 166.726,33.739 165.626,34.839 166.726,34.839 135.801,62.456 97.903,64.652 99.003,64.652 100.103,64.652 134.701,64.656 135.801,64.656 136.901,64.656 97.903,65.752 100.103,65.752
  other v7: 37.763,24.377 38.963,24.377 40.163,24.377 41.363,24.377 42.563,24.377 37.763,25.577 38.963,25.577 40.163,25.577 41.363,25.577 42.563,25.577 37.763,26.777 38.963,26.777 40.163,26.777 41.363,26.777 42.563,26.777 37.763,27.977 38.963,27.977 40.163,27.977 41.363,27.977 42.563,27.977 37.763,29.177 38.963,29.177 40.163,29.177 41.363,29.177 42.563,29.177
  other v8: 49.925,6.225 52.125,6.225 49.925,7.325 51.025,7.325 51.025,8.425 52.125,8.425 41.9,11.5 43,11.5 41.9,12.6 43,12.6 75.175,12.8 76.275,12.8 75.175,13.9 76.275,13.9 74.075,15 75.175,15 76.275,15
  other v9: 100.375,21.2 101.375,21.2 104.947,21.2 105.947,21.2 100.375,22.2 101.375,22.2 104.947,22.2 105.947,22.2
  other v10: 121.388,64.05 122.404,64.05 121.896,64.558
I2C_SCL_3V3: DD1.B6 DD8.6 DD14.16 R32.2 | length 123
  Top Layer w0.125: v2(92.15,56.725) 93.325,56.725 DD8.6@93.355,56.755 ; v3(105.136,47.464) 105.227,47.555 105.227,47.839 105.337,47.95 R32.2@105.825,47.95 ; DD1.B6@122.612,36.625 123,37.013 v2(123,43.275)
  Top Layer w0.2: v2(71.95,11.875) 72.225,12.15 DD14.16@72.775,12.15
  Layer 2 w0.125: v2(69.85,19.488) 69.923,19.488 70.061,19.35 70.882,19.35 73.282,21.75 75.425,21.75 77.425,23.75 92.357,23.75 93.425,24.818 93.425,42.782 92.025,44.182 92.025,55.862 91.887,56 91.887,56.3 92.097,56.51 92.097,56.672 v2(92.15,56.725) 93.468,56.725 101.712,48.481 101.712,48.295 102.707,47.3 104.34,47.3 104.504,47.464 104.925,47.464 v3@105.136,47.675 ; v3(105.136,47.464) v3@105.136,47.675 ; v2(123,43.275) 123,44.069 125.163,46.232 125.163,48.131 123.943,49.35 107.093,49.35 105.327,47.584 105.227,47.584 v3@105.136,47.675
  Layer 4 w0.2: v2(69.85,19.488) 69.812,19.526 69.602,19.526 69.541,19.587 69.209,19.587 68.975,19.353 68.975,18.93 72.325,15.58 72.325,12.25 v2(71.95,11.875)
I2C_SDA_3V3: DD1.E6 DD8.7 DD14.17 R31.2 | length 124.8
  Top Layer w0.125: v2(92.25,56.15) 92.295,56.105 DD8.7@93.355,56.105 ; v3(104.925,46.75) 105.791,46.75 R31.2@105.8,46.741
  Top Layer w0.2: v2(72.625,11) 73.205,11 73.425,11.22 DD14.17@73.425,11.5 ; DD1.E6@122.612,34.225 v2(123.013,34.626)
  Layer 2 w0.125: v2(69.375,19.188) 69.428,19.135 69.69,19.135 69.7,19.125 70.975,19.125 73.375,21.525 75.525,21.525 77.525,23.525 92.45,23.525 93.65,24.725 93.65,42.875 92.25,44.275 v2(92.25,56.15) 93.725,56.15 101.487,48.388 101.487,48.202 102.939,46.75 v3(104.925,46.75) ; v3@104.937,46.737 105.041,46.737 105.305,47.002 105.327,47.002 107.45,49.125 123.85,49.125 124.938,48.037 124.938,46.325 124.725,46.112 122.612,43.999 122.612,43.125 122.875,42.862 122.875,36.891 122.612,36.628 122.612,35.028 v2(123.013,34.626)
  Layer 4 w0.2: v2(69.375,19.188) 69.412,19.15 69.412,18.918 72.625,15.705 v2(72.625,11)
I2S1BCLK: DD1.AA4 R185.1 | length 52.7
  Top Layer w0.125: R185.1@72.775,18.861 72.775,19.375 72.859,19.459 72.984,19.459 73.125,19.6 v2(73.2,19.6)
  Top Layer w0.2: v2(120.611,21.826) DD1.AA4@121.012,21.425
  Layer 2 w0.125: v2(73.2,19.6) 73.2,20.05 73.725,20.575 92.88,20.575 96.93,24.625 102.074,24.625 102.574,24.125 105.7,24.125 105.975,24.4 116.456,24.4 118.656,22.2 120.237,22.2 v2(120.611,21.826)
I2S1DATA0: DD1.W6 R186.1 | length 58.4
  Top Layer w0.125: v2(69.7,17) 69.732,16.968 R186.1@70.547,16.968
  Top Layer w0.2: v2(122.211,22.624) DD1.W6@122.612,23.025
  Layer 2 w0.125: v2(69.7,17) 71.575,18.875 71.575,19.061 73.564,21.05 92.718,21.05 96.743,25.075 116.736,25.075 118.747,23.064 121.77,23.064 v2(122.211,22.624)
I2S1DATA1: DD1.W5 R187.1 | length 58
  Top Layer w0.125: v2(69.675,16.425) 70.021,16.079 R187.1@70.547,16.079
  Top Layer w0.2: v2(121.411,22.624) DD1.W5@121.812,23.025
  Layer 2 w0.125: v2(69.675,16.425) 71.8,18.55 71.8,18.968 73.657,20.825 92.811,20.825 96.836,24.85 116.642,24.85 118.653,22.839 120.684,22.839 120.9,22.624 v2(121.411,22.624)
I2S1MCLK: DD1.Y9 R188.1 | length 65.5
  Top Layer w0.125: v2(69.6,15.8) 70.133,15.267 70.47,15.267 R188.1@70.547,15.19
  Top Layer w0.2: v2(124.611,22.626) DD1.Y9@125.012,22.225
  Layer 2 w0.125: v2(69.6,15.8) 70.375,15.8 74.663,20.088 92.394,20.088 92.407,20.1 93.057,20.1 96.282,23.325 96.973,23.325 97.598,23.95 101.087,23.95 102.087,22.95 106.505,22.95 106.83,23.275 109.775,23.275 115.598,17.452 119.152,17.452 122.573,20.873 122.573,21.218 122.805,21.45 123.434,21.45 v2(124.611,22.626)
I2S1WCLK: DD1.Y6 R184.1 | length 54.1
  Top Layer w0.125: R184.1@73.664,18.861 73.664,19.527 73.894,19.757 v2(73.894,19.831)
  Top Layer w0.2: v2(122.211,21.824) DD1.Y6@122.612,22.225
  Layer 2 w0.125: v2(73.894,19.831) 74.412,20.35 92.989,20.35 96.189,23.55 96.88,23.55 97.505,24.175 101.888,24.175 102.388,23.675 105.886,23.675 106.161,23.95 115.138,23.95 116.1,22.988 116.25,22.988 116.255,22.983 116.817,22.983 119.204,20.596 120.742,20.596 120.976,20.83 120.976,21.102 121.327,21.452 121.635,21.452 121.959,21.777 122.164,21.777 v2(122.211,21.824)
ISO_USB_N: DD15.6 L63.2 VD3.2 | length 8.8
  Top Layer w0.2: v2(22.229,11.425) 22.267,11.463 22.267,11.605 22.279,11.616 VD3.2@22.279,12.106 ; L63.2@23.025,10.25 23.125,10.35 23.4,10.35 23.517,10.467 23.517,10.898 23.869,11.249 24.359,11.249 24.37,11.261 24.512,11.261 v2(24.55,11.299) 24.588,11.261 24.73,11.261 24.741,11.249 25.645,11.249 25.816,11.42 25.816,11.499 26.001,11.684 DD15.6@26.543,11.684
  Layer 3 w0.2: v2(22.229,11.425) 22.267,11.463 22.267,11.605 22.279,11.616 22.279,12.041 22.63,12.392 23.128,12.392 23.707,11.813 23.707,11.642 24.1,11.249 24.359,11.249 24.37,11.261 24.512,11.261 v2(24.55,11.299)
ISO_USB_P: DD15.7 L63.3 VD3.3 | length 8.4
  Top Layer w0.2: VD3.3@22.679,12.106 22.679,11.616 22.691,11.605 22.691,11.463 v2(22.729,11.425) ; L63.3@23.025,9.45 23.2,9.45 23.917,10.167 23.917,10.732 24.034,10.849 24.359,10.849 24.37,10.837 24.512,10.837 v2(24.55,10.799) 24.588,10.837 24.73,10.837 24.741,10.849 25.645,10.849 25.816,10.678 25.816,10.599 26.001,10.414 DD15.7@26.543,10.414
  Layer 3 w0.2: v2(22.729,11.425) 22.691,11.463 22.691,11.605 22.679,11.616 22.679,11.875 22.796,11.992 22.962,11.992 23.307,11.647 23.307,11.477 23.934,10.849 24.359,10.849 24.37,10.837 24.512,10.837 v2(24.55,10.799)
JTAG_TCK: DD1.G11 R21.2 XP2.6 | length 86.5
  Top Layer w0.125: R21.2@60.2,42.1 63.1,39.2 XP2.6@63.1,37.2
  Top Layer w0.2: DD1.G11@126.612,32.625 v2(127.013,33.026)
  Layer 1 w0.125: XP2.6@63.1,37.2 64.513,38.613 77.826,38.613 86.364,47.15 101.532,47.15 102.407,48.025 103.93,48.025 104.443,48.538 117.815,48.538 120.7,45.652 120.7,42.368 125.3,37.768 125.3,33.35 126.025,32.625 126.612,32.625 v2(127.013,33.026)
JTAG_TDI: DD1.H13 XP2.10 | length 78.4
  Top Layer w0.2: DD1.H13@128.212,31.825 v2(128.613,32.226)
  Layer 1 w0.125: XP2.10@67.1,37.2 68.063,38.162 78.013,38.162 86.55,46.7 102.923,46.7 104.361,48.137 110.351,48.137 110.526,48.313 117.722,48.313 120.475,45.559 120.475,42.275 125.075,37.675 125.075,32.852 126.063,31.864 128.251,31.864 v2(128.613,32.226)